# Altium PCB module-BGA_RG-4layers_v2.1.PcbDoc (part 3 of 3)
Units mm, origin at the board's own origin, x right, y up, seen from the top; angles counter-clockwise.
Board outline 20 x 20 mm, 4 copper layers (Top Layer, Signal Layer 1, Signal Layer 2, Bottom Layer), stack 1.546 mm thick; 75 components, 77 nets, 282 pads, 367 vias.
Unrouted connection lines stored in the file: 143.
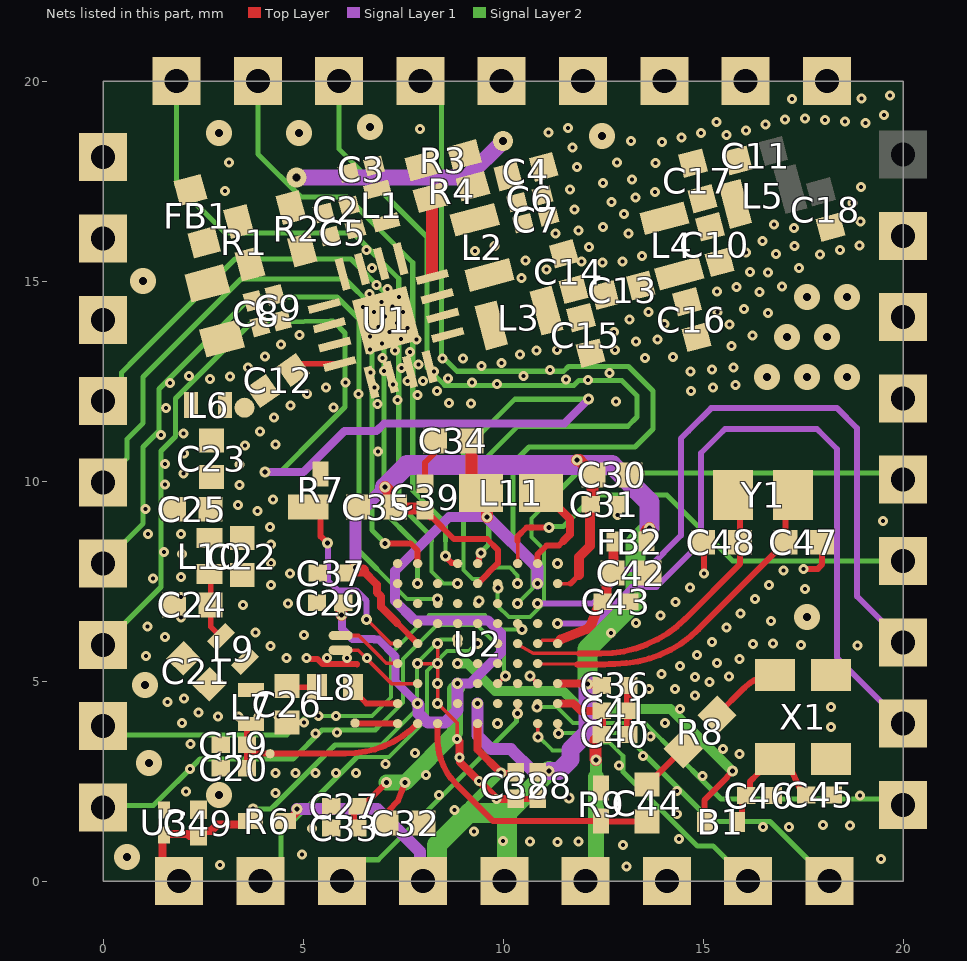
[diagram p4: the nets of this part, all layers, seen from the top]

## Via types
v1: diameter 0.25, hole 0.1, Top Layer to Signal Layer 1, 183 vias
v2: diameter 0.25, hole 0.1, Top Layer to Signal Layer 2, 62 vias
v3: diameter 0.25, hole 0.1, Top Layer to Bottom Layer, 36 vias
v4: diameter 0.275, hole 0.125, Top Layer to Signal Layer 2, 22 vias
v5: diameter 0.275, hole 0.125, Top Layer to Signal Layer 1, 20 vias
v6: diameter 0.65, hole 0.2, Top Layer to Bottom Layer, tented both sides, 17 vias
v7: diameter 0.25, hole 0.1, Signal Layer 1 to Signal Layer 2, 11 vias
v8: diameter 0.275/0/0.275 (per signal layer), hole 0.125, Top Layer to Signal Layer 2, 10 vias
v9: diameter 0.275, hole 0.125, Top Layer to Bottom Layer, 2 vias
v10: diameter 0.25/0/0.25 (per signal layer), hole 0.1, Top Layer to Signal Layer 2, 2 vias
v11: diameter 0.5, hole 0.2, Top Layer to Signal Layer 1, 2 vias

## Nets (pads, with @x,y where several pads share a name; then routed paths per layer and width w, separated by ;. In a path a pad name is that pad's centre, name@x,y a point inside that pad or via, vN(x,y) a via of type N, cw(c..) or ccw(c..) an arc to the next point about the centre after c; other vN are vias at no path point) (continued)
BOOT: pad.11 R7.2 U2.J5 | length 4.6
  Top Layer w0.09: v5(6.59,6.541) 7.193,5.939 7.364,5.939 U2.J5@7.366,5.937
  Top Layer w0.15: R7.2@5.44,9.35 5.44,8.618 v5(5.612,8.446)
  Top Layer w0.3: R7.2@5.44,9.35 R7.2@5.44,9.353
  Signal Layer 1 w0.15: v5(5.612,8.446) 5.625,8.434 5.625,7.507 5.866,7.266 6.33,7.266 6.59,7.005 v5(6.59,6.541)
GND: C2.2 C3.2 C4.2 C5.2 C6.2 C7.2 C8.1 C9.1 C14.2 C15.1 C16.1 C17.1 C18.1 C19.1 C20.1 C24.1 C25.1 C26.1 C27.1 C28.2 C29.2 C30.2 C31.1 C32.1 C33.1 C34.2 C35.1 C36.1 C37.1 C38.1 C39.1 C40.1 C41.2 C42.1 C43.1 C45.2 C46.2 C47.1 C48.1 C49.1 L6.1 pad.1@2.975,13.566 pad.2@20,16.129 pad.3@14.097,0 pad.3@20,14.097 pad.4@20,12.065 pad.5@9.967,20 pad.6@11.999,20 pad.7@0,14.031 pad.7@14.031,20 pad.8@16.063,20 pad.9@18.095,20 R7.1 R9.1 U1.2 U1.5 U1.6 U1.7 U1.8 U1.11 U1.14 U1.15 U1.17 U2.A1 U2.B7 U2.D9 U2.E3 U2.G5 U2.G6 U2.G7 U2.G8 U2.H6 U3.2 X1.1 X1.2 | length 12.2
  Top Layer w0.09: v5(7.866,5.437) v5(8.366,5.437) ; v5(8.366,5.937) v5(8.366,5.437) ; v1(8.852,3.556) 8.898,3.602 8.879,3.602 8.852,3.63 8.852,3.951 v5(8.366,4.437) v5(8.366,4.937) v5(8.366,5.437) ; U2.E3@9.366,6.937 9.366,6.966 v9(9.4,7) ; v8(10.676,5.127) U2.B7@10.866,4.937
  Top Layer w0.15: v2(5.09,5.572) 5.109,5.552 5.36,5.552 5.49,5.422 6.351,5.422 6.355,5.419 ; C39.1@8.05,9.93 8.05,10.46 8.3,10.71 C34.2@8.3,10.9 ; v5(9.866,3.937) U2.D9@9.882,3.921 ; C38.1@10.32,2.056 C28.2@10.87,2.056 ; C31.1@12.856,9.418 12.858,9.416 v3(12.858,9.153) ; C48.1@15.001,8.47 15.028,8.443 v1(15.028,7.689) ; v1(17.51,7.806) 17.868,7.806 17.978,7.916 C47.1@17.978,8.46
  Top Layer w0.2: v1(8.852,3.556) 8.852,3.542 8.907,3.487 8.907,3.093 v1(8.917,3.083) ; v1@8.926,3.074 8.926,2.971 v1(9.842,2.055) C38.1@10.32,2.056 ; C40.1@13.13,3.66 C41.2@13.13,4.255 C36.1@13.13,4.89
  other v1: 10,1 10.678,0.986 11.89,0.987 14.401,1.057 9.274,1.233 16.5,1.35 17.15,1.35 18,1.4 14.344,1.676 8.784,1.771 18.92,2.139 8.4,2.15 4.308,2.199 2.074,2.244 14.35,2.25 9.399,2.498 8.069,2.649 14.991,2.631 4.308,2.703 4.812,2.703 5.316,2.703 5.82,2.703 6.324,2.703 2.175,2.8 12.9,2.889 7.067,2.93 13.493,3.132 15.914,3.174 7.8,3.2 15.497,3.298 2.188,3.426 13.683,3.615 5.309,3.682 5.851,3.709 1.978,3.954 5.03,3.965 14.054,3.956 5.389,4.129 5.818,4.129 14.425,4.297 1.611,4.479 14.796,4.638 15.168,4.979 15.653,5.114 13.961,5.17 14.422,5.375 15.914,5.546 14.847,5.645 16.245,5.925 17.448,5.907 16.749,5.936 15.227,5.977 5.022,6.149 12.701,6.203 15.583,6.333 1.108,6.364 13.318,6.453 13.938,6.641 15.939,6.69 4.628,6.938 14.315,6.976 16.296,7.046 14.671,7.333 16.652,7.403 1.253,7.564 4.672,7.689 17.009,7.759 1.526,8.232 1.128,8.673 1.057,9.305 4.245,9.541 1.55,9.908 1.552,10.425 6.874,10.736 4.307,10.909 1.453,11.151 2.013,11.192 4.278,11.592 1.568,11.824 5.763,11.841 4.683,11.892 6.863,11.927 7.355,12.029 7.856,12.146 5.102,12.172 6.382,12.181 8.345,12.252 5.578,12.339 6.792,12.333 7.243,12.41 9.855,12.428 1.67,12.448 6.066,12.463 9.22,12.46 7.606,12.498 7.997,12.5 12.128,12.52 2.673,12.546 11.577,12.541 8.628,12.565 2.15,12.625 3.173,12.615 10.511,12.62 12.657,12.695 6.685,12.715 7.027,12.755 8.277,12.742 14.689,12.74 11.176,12.773 15.225,12.792 3.625,12.838 7.466,12.83 15.761,12.844 9.461,12.871 7.892,12.917 9.958,12.954 8.491,13.062 8.995,13.062 6.986,13.082 4.047,13.112 14.25,13.1 10.42,13.157 7.676,13.227 7.294,13.261 10.839,13.262 12.805,13.271 6.674,13.283 11.343,13.28 15.709,13.38 4.45,13.415 6.98,13.436 13.321,13.484 7.446,13.546 7.839,13.534 13.858,13.536 6.676,13.607 4.917,13.652 7.156,13.731 7.608,13.826 6.885,13.845 15.658,13.916 7.346,13.955 6.605,13.986 7.052,14.116 6.776,14.23 7.494,14.223 16.025,14.302 6.5,14.35 7.242,14.363 6.963,14.47 7.4,14.6 6.662,14.672 16.407,14.724 7.117,14.801 6.839,14.897 16.624,15.216 17.399,15.32 6.72,15.33 10.562,15.51 16.824,15.671 9.295,15.749 6.588,15.771 12.15,15.85 9.782,15.879 11.309,16.187 11.889,16.267 11.791,16.792 12.707,16.971 11.677,17.283 13.222,17.536 11.85,17.85 11.737,18.341 11.132,18.719 11.623,18.832 19.522,19.147 17.222,19.555 18.959,19.56 19.678,19.638
  other v2: 2.879,4.114 2.384,4.208 2.027,4.563 4.586,5.572 1.07,5.624 4.187,5.88 1.55,6.1 3.808,6.211 3.505,6.896 4.2,7.4 1.95,7.6 4.2,7.95 1.977,8.172 4.195,8.409 1.945,8.675 4.176,8.855 3.858,9.245 3.41,9.905 2.015,10.184 3.409,10.409 2.023,10.688 3.552,10.893 3.922,11.235 14.04,13.924 13.164,14.036 13.633,14.221 15.358,14.231 15.344,14.734 15.834,14.852 16.178,15.221 12.482,15.464 12.985,15.491 13.472,15.622 17.927,15.66 16.072,15.714 18.418,15.773 17.282,15.88 18.909,15.887 16.487,15.999 13.14,16.187 17.27,16.326 16.774,16.414 18.941,16.49 13.024,16.678 18.734,16.95 13.308,17.094 13.794,17.227 18.95,17.35 13.817,17.955 13.968,18.473 14.459,18.587 15.583,18.656 14.95,18.7 16.074,18.77 16.556,18.917 19.055,18.957 15.338,18.981 18.553,18.992 18.05,19.027 17.043,19.044 17.547,19.062
  other v3: 13.085,0.357 2.924,0.404 19.45,0.55 12.996,0.902 11.356,0.973 18.678,1.386 18.2,3.85 18.2,4.35 13.65,4.8 14.302,4.807 14.8,5.1 15.35,5.45 18.86,5.886 16.7,6.5 17.55,7.3 19.5,9 3.379,9.402 8.65,11.95 9.197,11.939 12.82,11.994 14.701,12.249 15.251,12.342 15.816,12.404 13.551,13.08 16.234,13.635 12.768,13.725 16.629,14.2 16.969,14.858 12.5,16.35 3.051,17.255 12.5,17.45 3.145,17.962 12.853,17.959 13.2,18.5 7.923,18.798
  other v5: 11.367,7.937
  other v6: 0.6,0.6 2.9,2.15 1.15,2.95 1.05,4.9 17.6,6.6 16.6,12.6 17.6,12.6 18.6,12.6 17.1,13.6 18.1,13.6 17.6,14.6 18.6,14.6 1,15 12.471,18.626 2.9,18.7 4.9,18.7 6.673,18.85
  other v7: 3.383,4.114 3.887,4.114 4.391,4.114 5.594,5.572 6.098,5.572 6.602,5.572 1.95,6.592 1.95,7.096 10.46,15.071 11.083,15.288 11.956,15.484
  other v9: 11.652,2.073
  other v10: 4.968,0.668 5.223,1.317
GRF_IN_4: C12.2 U1.3 U1.4 | length 1.2
  Top Layer w0.136: C12.2@4.754,12.778 4.906,12.93 U1.4@5.919,12.93
GRF_OUT_4: L2.2 L3.1 U1.9 U1.10
NetB1_1: B1.1 C45.1 C46.1 X1.4 | length 3.3
  Top Layer w0.15: B1.1@15.845,1.472 15.97,1.597 15.97,1.783 ; 15.97,1.783 15.97,2.025 16.171,2.226 16.171,2.483 16.375,2.688 16.375,2.725 16.7,3.05 X1.4@16.8,3.05 17.225,2.725 17.427,2.287 C45.1@17.483,2.076
NetC2_1: C2.1 C5.1 R2.1 U1.16
NetC3_1: C3.1 L1.2 R3.1
NetC8_2: C8.2 C9.2 R1.1 U1.1
NetC10_1: C10.1 C13.2 C16.2 L4.1
NetC10_2: C10.2 C11.1 C17.2 L4.2 L5.1
NetC13_1: C13.1 C14.1 C15.2 L3.2
NetC21_1: C21.1 C26.2 L7.2 L8.2 L9.1 | length 0.8
  Top Layer w0.136: C26.2@4.6,4.88 4.63,4.85 L8.2@5.35,4.85
NetC21_2: C21.2 C22.1 C24.2 L9.2 L10.1 | length 1.7
  Top Layer w0.136: L10.1@2.662,7.675 2.692,7.645 C24.2@2.692,6.903 2.692,6.363 L9.2@2.953,6.102
NetC22_2: C22.2 C23.1 C25.2 L10.2
NetC42_2: C42.2 C43.2 FB2.2 U2.A5 U2.B5 | length 3.8
  Top Layer w0.09: U2.B5@10.866,5.937 10.904,5.937 10.987,6.019 U2.A5@11.366,6.019
  Top Layer w0.15: U2.A5@11.366,5.937 U2.A5@11.417,6.014
  Top Layer w0.25: 11.442,6.039 12.1,6.302 12.21,6.411 12.391,6.898 C43.2@12.496,6.983 12.581,7.068 12.581,7.541 12.763,7.723 12.763,8.465 FB2.2@12.786,8.488
NetC44_1: C44.1 R8.2 | length 1.3
  Top Layer w0.15: C44.1@13.6,2.41 13.61,2.41 R8.2@14.503,3.303
NetL1_1: L1.1 U1.13
NetR4_1: R4.1 U1.12 | length 1.9
  Top Layer w0.3: R4.1@8.181,17.084 8.23,17.035 U1.12@8.23,15.157
NetU2_F8: U2.F8
NRST_2: C49.2 pad.9@1.905,0 R6.2 U2.F5 U3.1 | length 11.8
  Top Layer w0.09: U2.F5@8.866,5.937 v4(8.866,6.055)
  Top Layer w0.15: C49.2@2.2,1.172 C49.2@2.2,1.192
  Top Layer w0.2: U3.1@1.53,1.154 1.481,1.105 1.481,0.424 pad.9@1.905,0 ; U3.1@1.58,1.266 1.58,1.173 1.696,1.173 1.697,1.172 2.2,1.172 2.192,1.164 2.192,1.152 2.168,1.12 C49.2@2.383,1.12 2.383,1.14 2.493,1.25 2.7,1.25 2.864,1.414 3.602,1.414 R6.2@3.688,1.5 ; R6.2@3.656,1.531 3.75,1.625 v4(3.75,1.8)
  Signal Layer 2 w0.1: 6.95,3.4 7.85,4.3 7.85,5.45 8.442,6.042 v4@8.854,6.042
  Signal Layer 2 w0.127: v4(3.75,1.8) 4.2,1.8 5.8,3.4 6.95,3.4 ; v4@8.854,6.042 v4(8.866,6.055)
OSC_IN_5: C44.2 R9.2 U2.G9 | length 6.8
  Top Layer w0.15: U2.G9@8.366,3.937 8.366,3.536 ccw(c9.94,3.536) 8.372,3.4 ccw(c9.94,3.536) 8.827,2.423 9.748,1.502 R9.2@12.45,1.502 ccw(c12.48,1.533) 12.48,1.49 C44.2@13.6,1.49
PA0: U2.D6
PA1: pad.4@0,7.935 U2.G3 | length 19.4
  Signal Layer 2 w0.1: 6.85,7.8 7.598,7.053 v4(8.366,7.053)
  Signal Layer 2 w0.127: pad.4@0,7.935 1,8.935 1,10.85 1.4,11.25 1.4,12.3 3.7,14.6 5.85,14.6 6.4,14.05 6.4,11.25 6.4,8.25 6.85,7.8
PA2: pad.6@0,11.999 U2.H2 | length 16.6
  Signal Layer 2 w0.127: pad.6@0,11.999 0.465,12.464 0.465,12.715 0.85,13.1 3.3,15.55 6.2,15.55 7.029,14.721 7.029,11.25 7.029,9.221 7.75,8.5 7.866,8.384 v4(7.866,7.437)
PA3: pad.5@0,9.967 U2.H1 | length 17.3
  Top Layer w0.15: v4(7.052,8.442) 7.686,8.442 7.866,8.262 U2.H1@7.866,7.937
  Signal Layer 2 w0.127: pad.5@0,9.967 0.6,10.567 0.6,11.046 1,11.446 1,12.6 3.45,15.05 6.05,15.05 6.721,14.379 6.721,11.25 6.721,8.774 6.994,8.5 v4(7.052,8.442)
PA4: U2.J1
PA5: U2.J2
PA6: U2.F4
PA7: U2.H3
PA8: U2.J3
PA9: pad.8@3.937,0 U2.E5 | length 9
  Signal Layer 2 w0.1: 6.35,3.1 7.15,3.1 7.45,3.4 8.1,4.05 8.1,5.25 8.598,5.748 9.149,5.748 9.338,5.937 v4(9.366,5.937)
  Signal Layer 2 w0.127: pad.8@3.937,0 4.453,0.516 4.453,1.203 6.35,3.1
PA10: pad.7@5.969,0 U2.C8 | length 6.5
  Top Layer w0.09: v8(10.359,4.187) 10.363,4.19 10.363,4.434 U2.C8@10.366,4.437
  Signal Layer 2 w0.127: pad.7@5.969,0 6.494,0.525 6.575,0.525 6.582,0.532 6.882,0.532 10.341,3.991 10.341,4.169 v8(10.359,4.187)
PA11: pad.2@16.129,0 U2.B9 | length 7.5
  Top Layer w0.09: U2.B9@10.866,3.937 10.871,3.932 10.871,3.61 v8(10.876,3.604)
  Signal Layer 2 w0.1: v8(10.876,3.604) 10.904,3.604 11.239,3.27 11.72,3.27 11.85,3.4 11.9,3.45 11.914,3.464 12.665,3.464 13,3.129
  Signal Layer 2 w0.127: 13,3.129 13,2.733 14.858,0.875 15.254,0.875 pad.2@16.129,0
PA12: pad.1@18.161,0 U2.A9 | length 8.6
  Top Layer w0.09: U2.A9@11.366,3.937 11.378,3.925 11.378,3.705 v8(11.391,3.692)
  Signal Layer 2 w0.1: v8(11.391,3.692) 11.399,3.7 13,3.7 13.573,3.127
  Signal Layer 2 w0.127: 13.573,3.127 15.213,1.487 16.674,1.487 pad.1@18.161,0
PA13: pad.9@20,1.905 U2.B8 | length 10.2
  Signal Layer 2 w0.1: v8(10.85,4.35) 11.349,4.35 11.749,3.95 11.9,3.95 13.55,3.95 13.983,3.517
  Signal Layer 2 w0.127: 13.983,3.517 15.45,2.05 19.855,2.05 pad.9@20,1.905
PA14: pad.8@20,3.937 U2.A4 | length 18.1
  Signal Layer 1 w0.15: v5(11.366,6.437) 11.9,6.437 12.299,6.437 13.212,7.35 13.831,7.35 14.95,8.469 14.95,10.7 15.5,11.25 15.55,11.3 17.85,11.3 17.9,11.25 18.35,10.8 18.35,9.35 18.35,5.587 pad.8@20,3.937
PA15: pad.7@20,5.969 U2.B3 | length 17.5
  Signal Layer 1 w0.15: v5(10.866,6.937) 11.9,6.937 12.237,6.937 13.107,7.807 13.614,7.807 14.45,8.642 14.45,11.069 14.631,11.25 15.201,11.82 18.353,11.82 18.85,11.323 18.85,9.35 18.85,7.119 pad.7@20,5.969
PB1: U2.E7
PB2: U2.D8
PB3: pad.6@20,8.001 U2.C1 | length 11.4
  Top Layer w0.09: U2.C1@10.366,7.937 10.366,8.5
  Top Layer w0.15: 10.366,8.5 10.366,8.616 10.587,8.837 v4(11.155,8.837)
  Signal Layer 2 w0.127: v4(11.155,8.837) 11.179,8.861 11.505,8.861 12.294,9.65 14.094,9.65 15.743,8.001 pad.6@20,8.001
PB4: pad.3@0,5.903 U2.C2 | length 34
  Top Layer w0.09: v4(10.366,7.437) U2.C2@10.366,7.471
  Signal Layer 1 w0.2: v4(4.046,10.223) 5.008,10.223 6.036,11.25 6.836,11.25 7.03,11.444 11.533,11.444 v4(12.135,12.045)
  Signal Layer 2 w0.1: 9.009,8.5 9.009,7.781 9.234,7.555 9.511,7.555 9.792,7.836 10.171,7.836 10.365,7.643 v4(10.366,7.437) v4(10.366,7.437)
  Signal Layer 2 w0.127: pad.3@0,5.903 1.45,7.353 1.45,10.75 1.812,11.111 1.812,12.061 3.673,13.923 3.709,13.959 5.689,14.006 5.744,14.006 5.782,13.968 6.05,13.7 6.05,11.849 5.451,11.25 4.424,10.223 v4(4.046,10.223) ; 9.009,8.5 9.009,10.759 10.295,12.045 v4(12.135,12.045)
PB5: pad.5@20,10.033 U2.D2 | length 13.9
  Signal Layer 2 w0.1: v4(9.876,7.323) 9.866,7.313 9.866,6.878 10.144,6.6 10.68,6.6 11.024,6.945 11.024,8.284 10.808,8.5 10.708,8.6 10.708,9.058 11,9.35
  Signal Layer 2 w0.127: 11,9.35 11.85,10.2 19.833,10.2 pad.5@20,10.033
PB6: pad.3@5.903,20 U2.E1 | length 21.2
  Top Layer w0.09: U2.E1@9.366,7.937 U2.E1@9.393,7.964 ; v4@9.45,8.15 v4(9.45,8.2)
  Top Layer w0.15: U2.E1@9.393,7.964 9.393,8.093 v4@9.45,8.15
  Signal Layer 2 w0.127: pad.3@5.903,20 5.903,18.957 5.903,18.297 8.1,16.1 8.1,12.834 8.542,12.392 9.874,12.392 9.878,12.388 11.767,12.388 11.896,12.516 12.969,12.516 13.35,12.135 13.35,11.6 13.119,11.369 10.369,11.369 9.642,10.642 9.642,8.412 9.45,8.22 v4(9.45,8.2)
PB7: pad.4@7.935,20 U2.C3 | length 21.5
  Signal Layer 2 w0.1: 10.25,8.5 10.25,8.369 10.741,7.878 10.741,7.312 v4(10.366,6.937)
  Signal Layer 2 w0.127: pad.4@7.935,20 8.466,19.469 8.466,18.957 8.466,13.127 8.847,12.745 11.516,12.745 11.636,12.866 13.134,12.866 13.75,12.25 13.75,11.3 13.3,10.85 10.65,10.85 10.25,10.45 10.25,8.5
PB8: U2.D3
PB9: pad.2@0,3.871 U2.C4 | length 12.8
  Top Layer w0.09: U2.C4@10.366,6.437 10.366,6.416 10.479,6.303 v4(10.479,6.282)
  Signal Layer 2 w0.1: 4.6,3.65 5.074,4.124 6.724,4.124 7.194,4.595 7.194,5.694 8.145,6.645 9.555,6.645 9.918,6.282 v4(10.479,6.282)
  Signal Layer 2 w0.127: pad.2@0,3.871 0.221,3.65 4.6,3.65
PB10: U2.H4
PB11: U2.G4
PB12: U2.E6
PB13: pad.1@0,1.839 U2.D7 | length 13.7
  Top Layer w0.09: U2.D7@9.866,4.937 v4(10.056,5.127)
  Signal Layer 2 w0.1: 6.85,3.818 7.5,4.468 7.5,5.55 8.35,6.4 9.35,6.4 10.028,5.722 10.028,5.164 v4@10.056,5.136
  Signal Layer 2 w0.127: pad.1@0,1.839 0.048,1.887 1.256,1.887 2.421,3.053 4.753,3.053 5.473,3.773 6.805,3.773 6.85,3.818 ; v4(10.056,5.127) v4@10.056,5.136
PB14: U2.C6
PB15: U2.B4
PC0: pad.1@1.839,20 U2.F2 | length 17.6
  Signal Layer 2 w0.1: 8.211,8.5 8.211,7.739 8.513,7.437 v4(8.866,7.437)
  Signal Layer 2 w0.127: pad.1@1.839,20 1.839,18.957 1.839,17.413 3.052,16.2 6.25,16.2 7.393,15.057 7.393,11.25 7.393,9.425 8.211,8.606 8.211,8.5
PC1: pad.2@3.871,20 U2.F1 | length 14.9
  Top Layer w0.09: v4@8.561,8.107 v4(8.561,8.132) ; U2.F1@8.846,7.957 U2.F1@8.866,7.937
  Top Layer w0.15: v4@8.561,8.107 8.711,7.957 U2.F1@8.846,7.957
  Signal Layer 2 w0.1: v4(8.561,8.132) 8.561,8.5
  Signal Layer 2 w0.127: pad.2@3.871,20 3.871,18.957 3.871,18.179 4.95,17.1 6.1,17.1 7.742,15.458 7.742,11.25 7.742,9.758 8.561,8.939 8.561,8.5
PC2: U2.D4
PC3: U2.D5
PC4: U2.F3
PC5: U2.E4
PC6: U2.G2
PC13: U2.C7
RFI_N: pad.10@5.935,5.772 U2.H7 | length 2.3
  Top Layer w0.09: pad.10@5.935,5.772 6.378,5.772 6.85,5.3 7.213,4.937 U2.H7@7.866,4.937
RFI_P: pad.10@5.942,6.138 U2.J6 | length 1.7
  Top Layer w0.09: pad.10@5.942,6.138 6.393,6.138 6.705,5.826 6.85,5.681 7.084,5.447 7.356,5.447 U2.J6@7.366,5.437
RFIN: C12.1 C23.2 L6.2 pad.10@3.536,11.833
RFO_HP: pad.10@6.3,3.95 U2.J9 | length 1.1
  Top Layer w0.15: pad.10@6.3,3.95 6.313,3.937 6.85,3.937 U2.J9@7.366,3.937
RFO_LP: L8.1 U2.J8 | length 1.3
  Top Layer w0.136: L8.1@6.25,4.85 6.25,4.77 6.583,4.437
  Top Layer w0.15: 6.583,4.437 U2.J8@7.366,4.437
TCXO_OUT_5: R8.1 X1.3 | length 1.8
  Top Layer w0.15: R8.1@15.35,4.15 16.032,4.832 cw(c16.8,4.064) X1.3@16.8,5.15
V_EN1: C4.1 C6.1 C7.1 FB1.2 L2.1 pad.2@2.606,14.942 R1.2 R2.2 R3.2 R4.2 | length 5.5
  Signal Layer 1 w0.4: v11(4.842,17.594) 9.094,17.594 v11(10,18.5)
VBAT: C40.2 C41.1 pad.4@12.065,0 U2.A8 | length 5.6
  Top Layer w0.15: C40.2@12.315,3.525 12.45,3.66 C40.2@12.47,3.66 ; C41.1@12.465,4.25 C41.1@12.47,4.255
  Top Layer w0.2: U2.A8@11.366,4.437 11.763,4.437 11.95,4.25 C41.1@12.465,4.25 ; C40.2@12.47,3.66 C41.1@12.47,4.255
  Top Layer w0.3: C40.2@12.315,3.525 12.315,3.038 v4(12.327,3.026)
  Signal Layer 2 w0.3: 12.327,2.6 v4(12.327,3.026)
  Signal Layer 2 w0.4: pad.4@12.065,0 12.267,0.4 12.327,0.4 12.327,2.6
VDD: C28.1 C30.1 C31.2 C35.2 C36.2 C37.2 C38.2 C39.2 FB2.1 pad.5@10.033,0 pad.6@8.001,0 R6.1 U2.A2 U2.A7 U2.E2 U2.E8 U2.E9 U2.H5 | length 47.9
  Top Layer w0.09: U2.A2@11.366,7.437 11.687,7.437
  Top Layer w0.15: R6.1@4.512,1.5 R6.1@4.625,1.5 ; v5@4.826,1.776 v5(4.85,1.8) ; 7.353,6.45 U2.H5@7.866,5.937 ; C39.2@8.05,9.25 C39.2@8.05,9.27 ; C39.2@8.185,9.115 8.205,9.115 8.77,8.55 9.6,8.55 9.871,8.279 9.871,7.942 U2.E2@9.366,7.437 ; v8(9.95,2.7) 10.304,2.7 C38.2@10.32,2.716 ; C28.1@10.87,2.736 C28.1@10.87,2.716 10.904,2.75 v8(11.15,2.75) ; 11.687,7.437 11.9,7.65 ; C30.1@12.231,10.117 C30.1@12.231,10.197
  Top Layer w0.2: R6.1@4.625,1.5 4.826,1.702 v5@4.826,1.776 ; 6.498,7.76 6.85,7.408 6.85,7.214 6.954,7.11 6.954,6.849 7.353,6.45 ; C39.2@8.05,9.25 C39.2@8.185,9.115 ; U2.E9@9.366,3.937 9.366,3.284 v8(9.95,2.7) ; U2.A7@11.366,4.937 v4@12.098,4.937 ; v4(12.112,4.923) 12.126,4.908 12.452,4.908 C36.2@12.47,4.89
  Top Layer w0.25: 11.9,7.65 11.9,8.1 12.176,8.376 C31.2@12.176,9.418
  Top Layer w0.3: C37.2@6.03,7.7 6.09,7.76 6.498,7.76 ; C37.2@6.23,7.76 v5(6.312,7.843) ; v5(7.05,9.85) 7.15,9.75 7.15,9.5 7.34,9.31 8.01,9.31 C39.2@8.05,9.27 ; v5(11.855,10.521) 11.908,10.521 C30.1@12.231,10.197 ; C31.2@12.196,9.418 12.231,9.453 C30.1@12.231,10.117 ; FB2.1@13.586,8.488 13.586,8.751 v4(13.656,8.821)
  Signal Layer 1 w0.15: pad.6@7.921,0.08 pad.6@8.001,0
  Signal Layer 1 w0.3: v5(4.85,1.8) 6.859,1.8 7.921,0.737 pad.6@7.921,0.08 ; v5(6.312,7.843) 6.312,9.112 v5(7.05,9.85) ; v5(9.366,4.437) 9.366,3.634 9.704,3.296 10.194,3.296 10.74,2.75 v8(11.15,2.75)
  Signal Layer 1 w0.45: v8(11.15,2.75) 11.396,2.75 11.689,3.043 11.689,3.289 12.112,3.712 v4(12.112,4.923)
  Signal Layer 1 w0.5: v5(7.05,9.85) 7.601,10.4 12.726,10.4 13.656,9.47 v4(13.656,8.821)
  Signal Layer 2 w0.127: 9.15,1.7 9.15,1.9
  Signal Layer 2 w0.2: 9.15,1.9 v8(9.95,2.7)
  Signal Layer 2 w0.5: pad.6@8.001,0 8.351,0.35 8.351,0.901 9.15,1.7 10.1,1.7 ; pad.5@10.1,0 10.1,1.7 ; v8(11.15,2.75) 10.1,1.7 ; v4(12.112,4.923) 12.112,5.807 13.306,7.001 13.306,8.459 13.656,8.81 v4(13.656,8.821)
VDD_EXTPA: FB1.1 pad.8@0,16.063 pad.9@0,18.095
VDD_TCXO_5: B1.2 U2.F6 | length 9.6
  Top Layer w0.15: B1.2@15.045,1.472 15.034,1.483 15.034,2.019 15.597,2.582 15.597,2.602 15.733,2.737 v4(15.733,2.752)
  Signal Layer 2 w0.25: v4(8.866,5.437) 9.113,5.437 9.8,4.75 10.213,4.75 11.499,4.75 11.9,4.349 11.949,4.3 14.185,4.3 v4(15.733,2.752)
VDDPA: C27.2 C29.1 C32.2 C33.2 C34.1 L11.2 U2.B2 U2.F7 U2.H8 | length 24.8
  Top Layer w0.15: C33.2@6.355,1.324 6.274,1.405 6.274,1.783 6.496,2.005 6.626,2.005 v8(7.082,2.461) ; C32.2@7.09,1.45 7.144,1.504 7.144,1.764 7.369,1.999 v8(7.55,2.461)
  Top Layer w0.3: v5(5.956,6.65) 5.956,6.902 C29.1@6.009,6.956 ; C34.1@9.213,11.004 9.213,9.937 9.6,9.55 v5(9.6,9.1)
  Signal Layer 1 w0.2: v5(5.956,6.65) 5.97,6.636 5.97,6.311 6.235,6.047 6.78,6.047 6.783,6.043 6.88,6.043 7.309,5.615 7.309,4.994 v5(7.866,4.437)
  Signal Layer 1 w0.25: v8(8.866,4.937) 9.179,4.937 9.945,5.703 9.945,6.197 9.622,6.52 7.78,6.52 7.3,7 7.3,7.75 8.65,9.1 v5(9.6,9.1)
  Signal Layer 1 w0.3: v5(7.866,4.437) 7.89,4.413 7.89,4.185 8.118,3.957 8.55,3.957 8.866,4.273 v8(8.866,4.937) ; v5(9.6,9.1) 10.866,7.834 v5(10.866,7.437)
  Signal Layer 2 w0.3: v8@8.866,4.847 v8(8.866,4.937)
  Signal Layer 2 w0.4: v8(7.082,2.461) v8(7.55,2.461) 8.805,3.716 8.805,4.786 v8@8.866,4.847
VLXSMPS: L11.1 U2.B1 | length 2.6
  Top Layer w0.15: U2.B1@10.866,7.937 10.866,8.166 11.089,8.389 11.395,8.389 11.506,8.5
  Top Layer w0.2: L11.1@10.95,9.7 11.025,9.7 11.375,9.35 11.676,9.049 11.676,8.67 11.506,8.5
VR_PA: C19.2 C20.2 L7.1 pad.10@4.176,3.182 U2.H9 | length 5.6
  Top Layer w0.09: U2.H9@7.858,3.928 U2.H9@7.866,3.937
  Top Layer w0.15: C20.2@3.6,2.818 C19.2@3.6,3.405 3.6,3.683 cw(c3.942,3.683) L7.1@3.7,3.925 ; 3.626,3.185 6.061,3.185 ccw(c6.061,5.725) U2.H9@7.857,3.928
XTAL_IN_5: C47.2 U2.B6 Y1.1 | length 8.6
  Top Layer w0.09: U2.B6@10.866,5.437 11.85,5.419
  Top Layer w0.15: 11.85,5.419 12.128,5.414 ccw(c12.199,9.265) 12.33,5.415 cw(c12.336,5.265) 12.335,5.415 12.457,5.416 ccw(c12.444,8.684) 12.645,5.422 12.787,5.431 cw(c12.797,5.281) 12.797,5.431 ccw(c12.799,8.377) 14.882,6.294 C47.2@17.058,8.47 Y1.1@17.058,9.35
  Top Layer w0.3: Y1.1@17.058,9.35 17.058,9.458 Y1.1@17.25,9.65
XTAL_OUT_5: C48.2 U2.C5 Y1.2 | length 8.2
  Top Layer w0.09: U2.C5@10.366,5.937 10.438,5.873 10.764,5.691 11.9,5.691
  Top Layer w0.15: 11.9,5.691 12.337,5.691 ccw(c12.444,6.774) 12.444,5.686 ccw(c12.444,8.685) 14.564,6.564 15.921,7.921 C48.2@15.921,8.47 Y1.2@15.921,9.35
  Top Layer w0.3: Y1.2@15.75,9.65 15.921,9.479 Y1.2@15.921,9.35

## Polygon pours and split planes (outlines as drawn)
GND on Bottom Layer "GNDPLAN_4" (solid, remove dead copper, pour order 4): 0.008,-0.004 0.008,19.996 20.008,19.996 20.008,-0.004
GND on Signal Layer 1 "GNDPLAN_2" (solid, remove dead copper, pour order 0): 0,0 0,20 20,20 20,0
GND on Top Layer "GNDPLAN_4" (solid, remove dead copper, pour order 1): 0.008,-0.004 0.008,19.996 20.008,19.996 20.008,-0.004
GND on Signal Layer 2 "GNDPLAN_3" (solid, remove dead copper, pour order 2): -0.43,-0.084 -0.43,19.916 19.57,19.916 19.57,-0.084

## Other copper
Top Layer:
  pour cut-out: 14.2,11.25 18.75,11.25 18.75,8 18.744,7.994 14.215,7.994
  pour cut-out: 2.192,13.783 2.037,14.362 3.389,14.725 3.545,14.145
  region net RFIN: 3.023,10.747 3.289,11.21 3.516,11.397 3.637,11.497 4.075,11.935 4.12,12.001 4.177,12.058 4.208,12.129 3.847,12.49 3.581,12.334 3.214,12.224 2.876,11.879 2.876,11.576 2.673,11.415 2.399,11.316 2.399,11.05 2.417,10.753
  region net NetR4_1: 7.8,17.2 7.901,16.672 8,15.05 8.05,15.05 8.178,15.05 8.23,15.102 8.23,17.035
  region net NetC3_1: 6.506,17.365 6.658,17.4 6.615,17.585 6.571,17.771 6.514,18.011 6.751,18.075 6.95,18.15 7.241,18.118 7.626,18.075 8.315,17.694 7.498,17.429 7.217,17.204 6.98,17.148 6.615,17.058
  region net NetL1_1: 7.358,15.565 7.436,15.559 7.516,15.592 7.457,15.758 7.448,15.84 7.436,15.943 7.439,16.382 7.344,16.711 7.068,16.643 6.722,16.551 6.808,16.215 7.159,15.972 7.246,15.912
  region net NetC2_1: 5.25,16.85 5.3,16.608 5.345,16.441 5.392,16.267 5.175,16.222 4.925,16.148 4.6,16.05 4.724,15.545 4.782,15.341 4.942,15.382 5.4,15.484 5.935,15.071 5.969,15.105 6.104,15.105 6.05,15.421 5.954,15.959 5.872,16.26 5.792,16.554 5.715,16.838 5.681,16.962
  region net NetC8_2: 3.3,15.7 3.366,15.441 3.48,14.985 3.487,14.671 3.607,14.225 4.011,14.336 4.153,14.374 4.558,14.483 4.974,14.433 5.189,14.218 5.9,14.55 4.504,14.904 4.437,14.934 4.35,14.95 4.2,15 4.153,15.047 3.982,15.388 3.859,15.852
  region net V_EN1: 2.222,14.463 2.862,14.631 3.184,14.716 2.996,15.43 2.957,15.739 3.006,15.929 4.558,16.411 5.188,17.559 5.125,18.017 4.558,17.708 3.006,16.772 3.04,16.478 2.778,16.375 2.112,16.191 2.248,15.686 2.236,15.409 2.035,15.185 2,15.15
  region net V_EN1: 8.6,18.35 8.728,17.872 8.96,16.81 8.8,16.7 8.66,16.664 8.66,16.654 8.807,16.123 9.9,16.45 9.83,16.7 9.777,16.956 9.85,17.15 9.9,17.2 9.95,17.2 10,17.15 10.094,17.042 10.121,16.943 10.177,16.743 10.183,16.72 10.289,16.34 10.329,16.195 10.369,16.209 10.456,16.239 10.65,16.3 10.763,16.326 10.702,16.58 10.65,16.8 10.544,17.135 10.5,17.35 10.5,17.403 10.337,18 10.209,18.765 9.32,18.536
  region net VDD_EXTPA: 0,15.75 0,19.05 0.25,19.05 1.714,17.946 2.444,17.65 2.444,17.294 0.9,15.75
  region net NetC21_1: 2.65,4.5 3.3,4.5 3.412,4.596 3.981,4.602 4.281,4.576 4.91,4.576 5.108,4.515 5.601,4.515 5.601,5.185 5.281,5.185 4.368,5.185 3.658,5.844 3.619,5.792 3.19,5.387 2.661,5.349 2.562,5.251 2.231,4.913
  region net NetC10_1: 13.067,15.112 13.639,15.267 13.769,15.315 14.411,15.486 14.883,15.612 15.034,15.672 15.637,15.835 15.741,15.461 15.797,15.24 15.461,15.166 15.196,15.095 15.031,15.062 14.863,14.975 14.822,14.853 14.88,14.633 14.975,14.272 14.626,14.179 14.373,14.107 14.236,14.561 14.108,14.652 13.811,14.669 13.229,14.512
  region net RFO_LP: 5.999,4.519 6.645,4.348 7.4,4.374 7.4,4.494 7.15,4.5 6.503,5.179 6.49,5.187 6.001,5.187
  region net NetC21_2: 2.965,6.677 3.014,6.532 3.068,6.441 3.277,6.206 2.866,5.795 2.85,5.748 2.634,5.77 1.999,5.135 1.573,5.562 1.591,5.581 1.997,5.986 2.019,6.008 2.34,6.248 2.39,6.403 2.39,6.603 2.404,6.612
  region net NetC21_2: 3.8,7.95 3.15,7.95 3.129,7.929 2.334,7.929 2.334,7.411 2.44,7.036 2.99,7.193 2.99,7.35 3.8,7.35
  region net NetC22_2: 3.025,10.4 2.4,10.4 2.403,9.797 2.391,9.605 2.391,8.983 2.332,8.831 2.332,8.821 2.332,8.324 2.991,8.324 3.171,8.268 3.721,8.268 3.79,8.268 3.79,8.872 3.631,8.873 3.51,8.872 3.171,8.872 2.995,8.906 2.995,8.943 2.995,8.983 2.991,9.581 2.991,9.596 3.023,9.797
  region net GRF_IN_4: 6.156,13.616 6.338,12.937 5.553,12.725 5.174,12.694 5.1,12.674 4.996,12.651 4.996,12.656 4.609,13.043 4.821,13.205 5.105,13.307 5.366,13.405 5.985,13.57
  region net GND: 5.85,17.17 5.876,17.02 5.984,16.61 6.03,16.436 6.141,16.026 6.266,15.653 6.478,14.881 6.867,14.987 7.156,15.062 7.092,15.313 6.953,15.853 6.585,16.146 6.429,16.727 6.216,17.493 6.418,17.563 6.18,18.464 5.651,18.399
  region net ANT_ARGOS_2: 16.766,17.778 17.058,16.669 17.61,16.818 17.729,16.861 18.327,17.023 18.425,17.633 18.798,17.778 20.05,17.85 20.05,18.5 17.24,18.696 16.393,18.471 16.552,17.866
  region net NetC10_2: 13.554,16.147 13.459,16.5 13.401,16.719 14.32,16.971 14.52,17.021 14.609,17.292 15.562,17.548 15.507,18.23 16.08,18.39 16.241,17.791 16.359,16.359 14.959,15.984 14.57,16.421
  region net NetC13_1: 10.658,14.744 10.784,14.299 10.96,13.626 11.725,13.712 12.101,13.816 12.343,13.882 13.035,14.427 12.88,14.999 11.976,15.163 11.38,15.003
  region net GRF_OUT_4: 8.068,14.128 8.134,13.899 8.251,13.448 9.335,13.448 9.534,13.249 9.802,13.311 10.137,13.411 9.814,14.604 10.292,15.026 9.033,15.281 9.234,14.449
Signal Layer 1:
  pour cut-out: 2.733,12.374 3.289,12.426 3.756,12.628 4.894,13.455 5.724,13.661 5.724,12.586 5.633,12.579 5.205,12.545 4.198,11.823 3.95,11.6 3.95,11.29 3.2,10.54 3.2,9.2 3.4,9 3.85,9 4,8.85 4,7.15 3.25,7.15 3.25,6.55 4.45,5.35 6.45,5.35 6.828,4.819 6.803,4.553 6.55,4.3 2.565,4.3 1.474,5.392 1.474,5.774 2.1,6.4 2.158,11.061 2.34,11.929
  pour cut-out: 19.971,17.84 19.862,18.762 18.682,18.803 18.317,18.856 17.867,18.887 17.511,18.911 17.249,18.911 16.83,18.849 16.428,18.737 16.191,18.658 15.929,18.586 15.627,18.504 15.437,18.456 14.763,18.536 14.346,18.473 14.275,18.402 14.156,18.23 14.156,17.896 14.313,17.25 13.472,16.979 13.152,16.803 13.248,16.389 13.482,15.499 12.755,15.27 12.176,15.373 11.908,15.342 10.528,14.87 10.258,15.74 8.939,15.401 9.059,14.54 8.801,14.45 8.801,13.276 9.283,13.281 9.488,13.07 10.869,13.472 11.715,13.472 12.15,13.55 12.45,13.65 12.805,13.687 12.768,13.725 13.08,14.036 13.449,14.036 13.633,14.221 13.93,13.924 14.376,13.924 14.55,13.75 14.6,13.8 15.05,13.8 15.05,13.923 15.358,14.231 15.282,14.306 15.282,14.908 15.891,14.908 16.077,15.095 15.903,15.848 16.487,16.079 16.589,16.229 16.774,16.414 16.862,16.326 18.547,16.803 18.644,17.517 19.971,17.426

## Silkscreen, mask and mechanical layers (free items; w line width, h text height)
Top Overlay:
  drawing of 15 lines, arcs and shapes, not listed
  text "V1.0#3" at 14.2,11.25 h0.8
  text "BOOT" at 5.05,10.05 h0.4 r90
Bottom Overlay:
  drawing of 46 lines, arcs and shapes, not listed
  text "V1.0" at 18.146,16.804 h1.52
  text "SMD Argos" at 18.196,14.112 h1.52
Mechanical 1:
  drawing of 299 lines, arcs and shapes, not listed
  text "Layer" at 33.089,37.147 h1.52
  text "Name" at 43.5,37.147 h1.52
  text "Material" at 67.37,37.147 h1.52
  text "Thickness" at 89.208,37.147 h1.52
  text "Constant" at 105.714,37.147 h1.52
  text "Board Layer Stack" at 120.188,37.147 h1.52
  text "Top Overlay" at 43.5,34.099 h1.52
  text "Top Solder" at 43.5,31.051 h1.52
  text "Solder Resist" at 67.37,31.051 h1.52
  text "0,020mm" at 89.208,31.051 h1.52
  text "3.5" at 105.714,31.051 h1.52
  text "1" at 33.089,28.003 h1.52
  text "Top Layer" at 43.5,28.003 h1.52
  text "0,035mm" at 89.208,28.003 h1.52
  text "Dielectric 1" at 43.5,24.955 h1.52
  text "PP-010" at 67.37,24.955 h1.52
  text "0,071mm" at 89.208,24.955 h1.52
  text "4" at 105.714,24.955 h1.52
  text "2" at 33.089,21.907 h1.52
  text "Signal Layer 1" at 43.5,21.907 h1.52
  text "0,035mm" at 89.208,21.907 h1.52
  text "Dielectric 2" at 43.5,18.859 h1.52
  text "Core-002" at 67.37,18.859 h1.52
  text "1,265mm" at 89.208,18.859 h1.52
  text "4" at 105.714,18.859 h1.52
  text "3" at 33.089,15.811 h1.52
  text "Signal Layer 2" at 43.5,15.811 h1.52
  text "0,035mm" at 89.208,15.811 h1.52
  text "Dielectric 3" at 43.5,12.763 h1.52
  text "PP-010" at 67.37,12.763 h1.52
  text "0,071mm" at 89.208,12.763 h1.52
  text "4" at 105.714,12.763 h1.52
  text "4" at 33.089,9.715 h1.52
  text "Bottom Layer" at 43.5,9.715 h1.52
  text "0,035mm" at 89.208,9.715 h1.52
  text "Bottom Solder" at 43.5,6.667 h1.52
  text "Solder Resist" at 67.37,6.667 h1.52
  text "0,020mm" at 89.208,6.667 h1.52
  text "3.5" at 105.714,6.667 h1.52
  text "Bottom Overlay" at 43.5,3.619 h1.52
  text "Total board thickness:" at 33.089,0.571 h1.52
  text "1,586mm" at 89.208,0.571 h1.52
Top Assembly:
  lines w0.1: 1.968,15.198 3.031,15.483 3.613,13.309 2.551,13.025 1.968,15.198
Mechanical 17:
  lines w0.05: 2.308,14.124 3.274,14.383 ; 2.661,14.737 2.92,13.771 ; 1.778,15.328 3.13,15.691 3.803,13.179 2.451,12.817 1.778,15.328